# Altium PCB MainPCB.PcbDoc
Units mm, origin at the board's own origin, x right, y up, seen from the top; angles counter-clockwise.
Board outline 91 x 73 mm, 2 copper layers (Top Layer, Bottom Layer); 88 components, 40 nets, 344 pads, 4 vias.
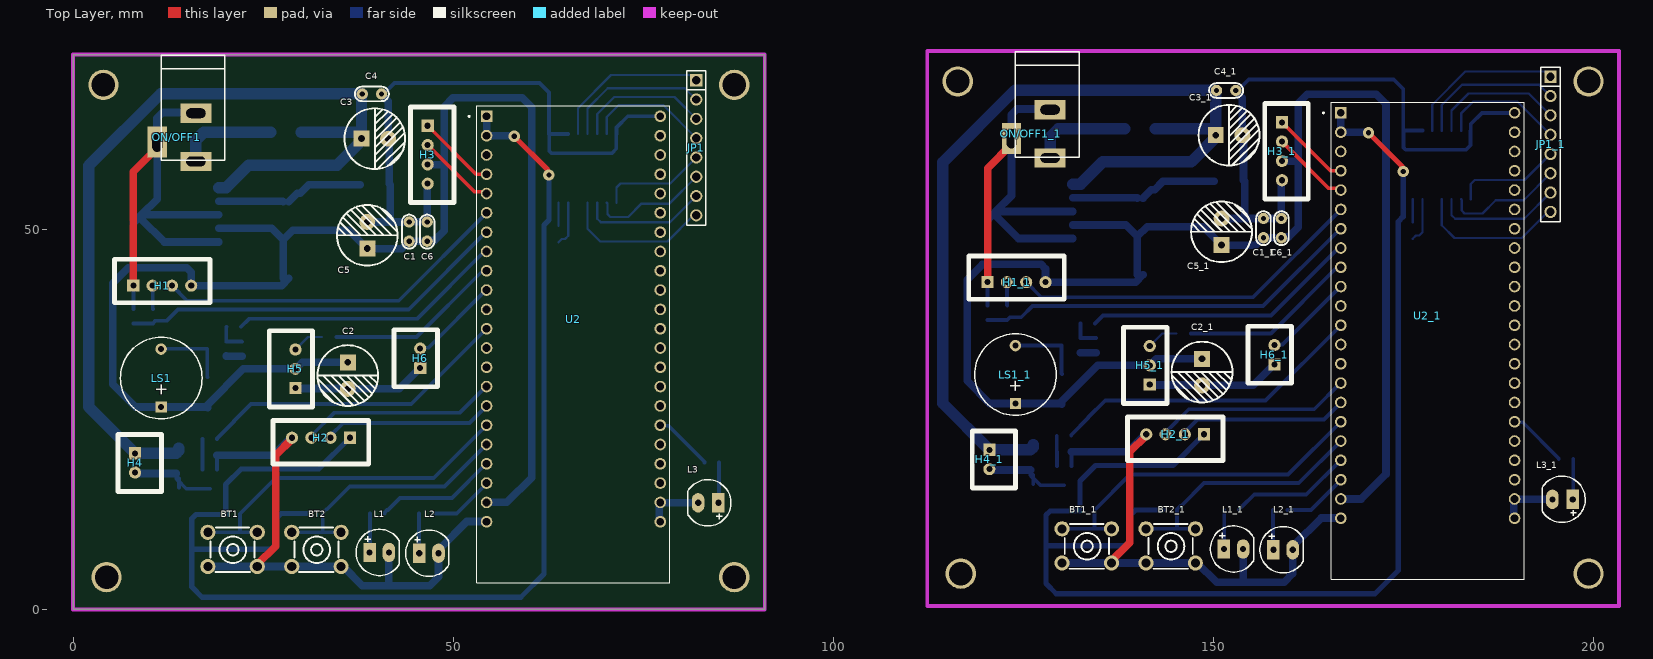
[diagram p0: Top Layer view]
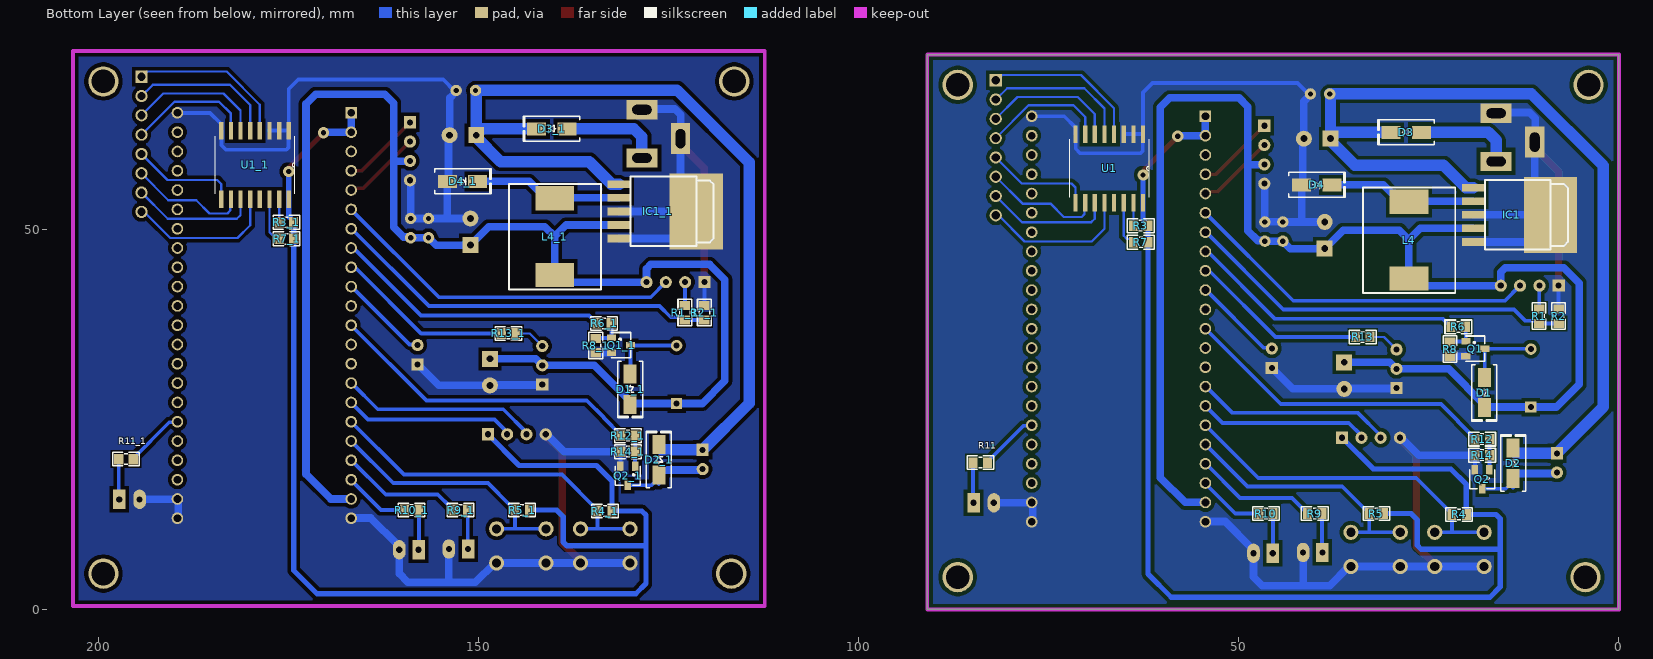
[diagram p1: Bottom Layer view, seen from below]

## Layer stack, top to bottom
Top Solder: solder mask 0.0102, Solder Resist, Dk 3.5
Top Layer: signal copper 0.0356
Dielectric 1: dielectric 0.32, FR-4, Dk 4.8
Bottom Layer: signal copper 0.0356
Bottom Solder: solder mask 0.0102, Solder Resist, Dk 3.5

## Board outline
-0.003,0.003 -0.003,73.003 90.997,73.003 90.997,0.003

## Design rules (kind name [scope] priority, off if disabled: settings)
Clearance [All] p1: gap=0.5 ignorepadtopadclearanceinfootprint=FALSE
PolygonConnect [All] p1: connectstyle=Direct reliefconductorwidth=0.254 reliefentries=4 polygonreliefangle="90 Angle" airgapwidth=0.254
RoutingVias [All] p1: holewidth=0.711 width=1.27 viastyle="Through Hole" minholewidth=0.711 minwidth=1.27 maxholewidth=0.711 maxwidth=1.27
SolderMaskExpansion [All] p1: expansion=0.102 istentingtop=FALSE
Width [All] p1: maxlimit=1 minlimit=0.3 preferedwidth=0.5
30 further rules are at their usual default settings.

## Classes and differential pairs
component class MainSCH: BT1 BT2 C1 C2 C3 C4 C5 C6 D1 D2 D3 D4 H1 H2 H3 H4 H5 H6 IC1 JP1 L1 L2 L3 L4 LS1 ON/OFF1 Q1 Q2 R1 R2 R3 R4 R5 R6 R7 R8 R9 R10 R11 R12 R13 R14 U1 U2

## Components (designator, comment, footprint, x,y, rotation, side; value= is the part's Value field where it differs from the comment)
BT1 "Button 2P SMD" PUSH_BUTTON_6X6 20.98,7.893 r180 top
BT1_1 "Button 2P SMD" PUSH_BUTTON_6X6 133.375,8.35 r180 top (schematic designator BT1)
BT2 "Button 2P SMD" PUSH_BUTTON_6X6 32.017,7.893 r180 top
BT2_1 "Button 2P SMD" PUSH_BUTTON_6X6 144.412,8.35 r180 top (schematic designator BT2)
C1 "100nF" "tu gom" 44.221,49.708 r90 top
C1_1 "100nF" "tu gom" 156.616,50.165 r90 top (schematic designator C1)
C2 "470uF" "tu hoa 8mm" 36.144,30.759 r270 top
C2_1 "470uF" "tu hoa 8mm" 148.539,31.217 r270 top (schematic designator C2)
C3 "470uF" "tu hoa 8mm" 39.7,61.932 r0 top
C3_1 "470uF" "tu hoa 8mm" 152.095,62.389 r0 top (schematic designator C3)
C4 "104" "tu gom" 39.319,67.818 r0 top
C4_1 "104" "tu gom" 151.714,68.275 r0 top (schematic designator C4)
C5 "470uF" "tu hoa 8mm" 38.71,49.225 r90 top
C5_1 "470uF" "tu hoa 8mm" 151.105,49.682 r90 top (schematic designator C5)
C6 "100nF" "tu gom" 46.584,49.708 r90 top
C6_1 "100nF" "tu gom" 158.979,50.165 r90 top (schematic designator C6)
D1 "SS34" "DIODE (DO-214AB)" 17.704,28.531 r270 bottom
D1_1 "SS34" "DIODE (DO-214AB)" 130.099,28.988 r270 bottom (schematic designator D1)
D2 "SS34" "DIODE (DO-214AB)" 13.925,19.234 r90 bottom
D2_1 "SS34" "DIODE (DO-214AB)" 126.32,19.692 r90 bottom (schematic designator D2)
D3 "SS34" "DIODE SMA" 27.991,62.763 r0 bottom
D3_1 "SS34" "DIODE SMA" 140.386,63.221 r0 bottom (schematic designator D3)
D4 "SS34" "DIODE SMA" 39.751,55.855 r180 bottom
D4_1 "SS34" "DIODE SMA" 152.146,56.312 r180 bottom (schematic designator D4)
H1 "HX711" XH2.54M-4 7.925,42.596 r0 top
H1_1 "HX711" XH2.54M-4 120.32,43.053 r0 top (schematic designator H1)
H2 "HX711" XH2.54M-4 36.424,22.581 r180 top
H2_1 "HX711" XH2.54M-4 148.819,23.038 r180 top (schematic designator H2)
H3 "LCD 1602" XH2.54M-4 46.66,63.627 r270 top
H3_1 "LCD 1602" XH2.54M-4 159.055,64.084 r270 top (schematic designator H3)
H4 "MC38" XH2.54M-2 8.159,20.536 r270 top
H4_1 "MC38" XH2.54M-2 120.554,20.993 r270 top (schematic designator H4)
H5 "SERVO" XH2.54M-3 29.261,29.108 r90 top
H5_1 "SERVO" XH2.54M-3 141.656,29.566 r90 top (schematic designator H5)
H6 "MC38" XH2.54M-2 45.669,31.775 r90 top
H6_1 "MC38" XH2.54M-2 158.064,32.233 r90 top (schematic designator H6)
IC1 "LM2576" TO-263-5 19.157,55.437 r270 bottom
IC1_1 "LM2576" TO-263-5 131.552,55.895 r270 bottom (schematic designator IC1)
JP1 "KEYPAD" "JP 1x8 DT" 81.991,69.621 r270 top
JP1_1 "KEYPAD" "JP 1x8 DT" 194.386,70.079 r270 top (schematic designator JP1)
L1 "LED 5mm" LED-5MM-RED 39.014,7.493 r0 top
L1_1 "LED 5mm" LED-5MM-RED 151.409,7.95 r0 top (schematic designator L1)
L2 "LED 5mm" LED-5MM-Yellow 45.542,7.391 r0 top
L2_1 "LED 5mm" LED-5MM-Yellow 157.937,7.849 r0 top (schematic designator L2)
L3 "LED 5mm" LED-5MM-Green 84.785,14.021 r180 top
L3_1 "LED 5mm" LED-5MM-Green 197.18,14.478 r180 top (schematic designator L3)
L4 "100uH" "CDRH127 12x12x7" 27.635,53.645 r0 bottom
L4_1 "100uH" "CDRH127 12x12x7" 140.03,54.102 r0 bottom (schematic designator L4)
LS1 "Coi Chip Speaker" "Coi Chip Speacker" 11.595,26.626 r90 top
LS1_1 "Coi Chip Speaker" "Coi Chip Speacker" 123.99,27.083 r90 top (schematic designator LS1)
ON/OFF1 "POWER" DC-IN 13.614,62.11 r270 top
ON/OFF1_1 "POWER" DC-IN 126.009,62.567 r270 top (schematic designator ON/OFF1)
Q1 "C1815" SOT-23 18.898,34.297 r270 bottom
Q1_1 "C1815" SOT-23 131.293,34.754 r270 bottom (schematic designator Q1)
Q2 "AO3400" SOT-23 18.014,17.126 r0 bottom
Q2_1 "AO3400" SOT-23 130.409,17.583 r0 bottom (schematic designator Q2)
R1 "1k" "tro smd 0805" 10.566,38.583 r90 bottom
R1_1 "1k" "tro smd 0805" 122.961,39.04 r90 bottom (schematic designator R1)
R2 "2k" "tro smd 0805" 7.874,38.583 r270 bottom
R2_1 "2k" "tro smd 0805" 120.269,39.04 r270 bottom (schematic designator R2)
R3 "4.7k" "tro smd 0805" 62.916,50.419 r0 bottom
R3_1 "4.7k" "tro smd 0805" 175.311,50.876 r0 bottom (schematic designator R3)
R4 "10k" "tro smd 0805" 21.031,12.548 r180 bottom
R4_1 "10k" "tro smd 0805" 133.426,13.005 r180 bottom (schematic designator R4)
R5 "10k" "tro smd 0805" 31.915,12.675 r180 bottom
R5_1 "10k" "tro smd 0805" 144.31,13.132 r180 bottom (schematic designator R5)
R6 "220R" "tro smd 0805" 21.133,37.236 r180 bottom
R6_1 "220R" "tro smd 0805" 133.528,37.694 r180 bottom (schematic designator R6)
R7 "4.7k" "tro smd 0805" 62.916,48.362 r180 bottom
R7_1 "4.7k" "tro smd 0805" 175.311,48.819 r180 bottom (schematic designator R7)
R8 "10k" "tro smd 0805" 22.286,34.25 r90 bottom
R8_1 "10k" "tro smd 0805" 134.681,34.707 r90 bottom (schematic designator R8)
R9 "220R" "tro smd 0805" 40.024,12.675 r180 bottom
R9_1 "220R" "tro smd 0805" 152.419,13.132 r180 bottom (schematic designator R9)
R10 "220R" "tro smd 0805" 46.45,12.675 r180 bottom
R10_1 "220R" "tro smd 0805" 158.845,13.132 r180 bottom (schematic designator R10)
R11 "220R" "tro smd 0805" 84.023,19.253 r0 bottom
R11_1 "220R" "tro smd 0805" 196.418,19.71 r0 bottom (schematic designator R11)
R12 "220R" "tro smd 0805" 17.989,22.46 r180 bottom
R12_1 "220R" "tro smd 0805" 130.384,22.917 r180 bottom (schematic designator R12)
R13 "220R" "tro smd 0805" 33.706,35.789 r0 bottom
R13_1 "220R" "tro smd 0805" 146.101,36.246 r0 bottom (schematic designator R13)
R14 "10k" "tro smd 0805" 17.989,20.352 r180 bottom
R14_1 "10k" "tro smd 0805" 130.384,20.809 r180 bottom (schematic designator R14)
U1 "PCF8574T/3,512" SOIC127P1032X265-16N 67.056,58.014 r270 bottom
U1_1 "PCF8574T/3,512" SOIC127P1032X265-16N 179.451,58.471 r270 bottom (schematic designator U1)
U2 "ESP32-S3-DEVKITC-1-N16R8V" ESP32-S3-DEVKITC-1-N16R8V 65.837,38.202 r0 top
U2_1 "ESP32-S3-DEVKITC-1-N16R8V" ESP32-S3-DEVKITC-1-N16R8V 178.232,38.659 r0 top (schematic designator U2)

## Footprints (in the part's own frame and the unit in brackets; to place one, negate y for a bottom-side part, rotate by r counter-clockwise, add the part's x,y. Pads: shape width x height; smd on the part's side, far side on the other; paste and mask are expansions set on the pad)
"CDRH127 12x12x7" [mm]
  rect 5.1x3.2 smd: 1(0,0) 2(0,10.1)
  silkscreen extent -6.1,-1.87 6.01,12, body extent -6,-1 6,11, height 7.42
"Coi Chip Speacker" [mm]
  rect 1.5x1.5 hole 0.8: 1(0,0)
  round 1.5 hole 0.8: 2(7.62,0.013)
  silkscreen extent -1.55,-5.38 9.18,5.36, body extent -2.2,-6 13.24,6, height 4.5
DC-IN [mil] "Jac DC input"
  rect 100x160 hole 50 slot 100 at 90 deg: 1(125,100) 2(-125,100)
  rect 160x100 hole 50 slot 100 at 0 deg: 3(25,-100)
  silkscreen extent -425,-80 120,250, body extent -410,-105 134,269, height 434
"DIODE (DO-214AB)" [mm]
  rect 2.5x1.7 smd: 1(-2,0) 2(2,0)
  silkscreen extent -3.68,-1.65 3.75,1.65, body extent -2.6,-1.37 2.6,1.37, height 2.4
"DIODE SMA" [mm] "SMA"
  rect 2.5x1.7 smd: 1(-2,0) 2(2,0)
  silkscreen extent -3.68,-1.65 3.75,1.65, body extent -2.6,-1.37 2.6,1.37, height 2.4
ESP32-S3-DEVKITC-1-N16R8V [mm]
  rect 1.53x1.53 hole 1.02 mask+0.102: J1_1(-11.43,26.67)
  round 1.53 hole 1.02 mask+0.102: J1_2(-11.43,24.13) J1_3(-11.43,21.59) J1_4(-11.43,19.05) J1_5(-11.43,16.51) J1_6(-11.43,13.97) J1_7(-11.43,11.43) J1_8(-11.43,8.89) J1_9(-11.43,6.35) J1_10(-11.43,3.81) J1_11(-11.43,1.27) J1_12(-11.43,-1.27) J1_13(-11.43,-3.81) J1_14(-11.43,-6.35) J1_15(-11.43,-8.89) J1_16(-11.43,-11.43) J1_17(-11.43,-13.97) J1_18(-11.43,-16.51) J1_19(-11.43,-19.05) J1_20(-11.43,-21.59) J1_21(-11.43,-24.13) J1_22(-11.43,-26.67) J3_1(11.43,26.67) J3_2(11.43,24.13) J3_3(11.43,21.59) J3_4(11.43,19.05) J3_5(11.43,16.51) J3_6(11.43,13.97) J3_7(11.43,11.43) J3_8(11.43,8.89) J3_9(11.43,6.35) J3_10(11.43,3.81) J3_11(11.43,1.27) J3_12(11.43,-1.27) J3_13(11.43,-3.81) J3_14(11.43,-6.35) J3_15(11.43,-8.89) J3_16(11.43,-11.43) J3_17(11.43,-13.97) J3_18(11.43,-16.51) J3_19(11.43,-19.05) J3_20(11.43,-21.59) J3_21(11.43,-24.13) J3_22(11.43,-26.67)
  silkscreen extent -13.82,-34.67 12.7,28.07, body extent -12.7,-35.26 12.7,34.38, height 7.39
"JP 1x8 DT" [mm] "8 pins, 1 row, straight, gold plating"
  rect 1.6x1.6 hole 1.1: 1(0,0)
  round 1.6 hole 1.1: 2(2.54,0) 3(5.08,0) 4(7.62,0) 5(10.16,0) 6(12.7,0) 7(15.24,0) 8(17.78,0)
  silkscreen extent -1.27,-1.27 19.05,1.27, body extent -1.27,-1.27 19.05,1.27, height 8.54
LED-5MM-Green [mil] "LED 2 PIN, 5 ly , Only colour,pin to pin 100mil"
  rect 65x100 hole 32: 1(-5,0)
  oval 65x100 hole 32: 2(100,0)
  silkscreen extent -70,-120 154,120, body extent -69,-120 145,117, height 339
LED-5MM-RED [mil] "LED 2 PIN, 5 ly , Only colour,pin to pin 100mil"
  rect 65x100 hole 32: 1(0,0)
  oval 65x100 hole 32: 2(100,0)
  silkscreen extent -70,-120 154,120, body extent -65,-119 149,118, height 339
LED-5MM-Yellow [mil] "LED 2 PIN, 5 ly , Only colour,pin to pin 100mil"
  rect 65x100 hole 32: 1(0,0)
  oval 65x100 hole 32: 2(100,0)
  silkscreen extent -70,-120 154,120, body extent -67,-122 147,115, height 339
PUSH_BUTTON_6X6 [mm]
  round 2 hole 1.2: 1(-3.25,-2.25) 1(3.25,-2.25) 2(-3.25,2.25) 2(3.25,2.25)
  silkscreen extent -2.9,-2.9 2.9,3, body extent -3.94,-3.07 4.07,2.93, height 6.8
SOIC127P1032X265-16N [mil]
  rect 90x22 smd: 1(-178,175) 2(-178,125) 3(-178,75) 4(-178,25) 5(-178,-25) 6(-178,-75) 7(-178,-125) 8(-178,-175) 9(178,-175) 10(178,-125) 11(178,-75) 12(178,-25) 13(178,25) 14(178,75) 15(178,125) 16(178,175)
  silkscreen extent -150,-206 150,207, body extent -203,-203 203,203, height 104
SOT-23 [mm]
  rect 0.85x1.2 smd: 1(-0.963,-1.245) 2(0.963,-1.25) 3(-0.018,1.25)
  silkscreen extent -1.67,-1.27 1.63,1.27, body extent -1.5,-1.33 1.5,1.17, height 1.06
TO-263-5 [mm]
  rect 1x3.048 smd: 1(-0.017,0.005) 2(1.761,0.005) 3(3.539,0.005) 4(5.317,0.005) 5(7.095,0.005)
  rect 10x7 smd: 6(3.539,10.165)
  silkscreen extent -1.03,1.53 8.11,12.45, body extent -1.54,-0.29 8.62,13.72, height 4.58
"tro smd 0805" [mm]
  rect 1.2x1.4 smd: 1(-0.946,-0.061) 2(0.954,-0.061)
  silkscreen extent -1.75,-0.97 1.75,0.84, body extent -1.56,-0.76 1.44,0.64, height 0.53
"tu gom" [mm] "Tu gom mini"
  round 1.5 hole 0.7: 1(-1.27,0) 2(1.27,0)
  silkscreen extent -2.25,-0.97 2.22,0.97, body extent -2.92,-0.85 2.92,0.85, height 6.12
"tu hoa 8mm" [mm]
  rect 2.1x2.1 hole 0.9: 1(-1.75,0)
  round 2.1 hole 0.9: 2(1.75,0)
  silkscreen extent -4,-4 4,4, body extent -4.1,-4.07 4.1,4.13, height 13.81
XH2.54M-2 [mm]
  rect 1.6x1.6 hole 0.8: 1(0,0)
  round 1.6 hole 0.8: 2(2.54,0)
  silkscreen extent -2.48,-2.26 5.02,3.46, body extent -2.48,-2.26 5.02,3.48, height 6.91
XH2.54M-3 [mm]
  rect 1.6x1.6 hole 0.8: 1(0,0)
  round 1.6 hole 0.8: 2(2.54,0) 3(5.08,0)
  silkscreen extent -2.48,-2.26 7.56,3.46, body extent -2.48,-2.26 7.56,3.48, height 6.91
XH2.54M-4 [mm]
  rect 1.6x1.6 hole 0.8: 1(0,0)
  round 1.6 hole 0.8: 2(2.54,0) 3(5.08,0) 4(7.62,0)
  silkscreen extent -2.48,-2.26 10.1,3.46, body extent -2.48,-2.26 10.1,3.48, height 6.91

## Part data
BT1 BT1_1 BT2 BT2_1: "Push Button Tactile Switch SMD 2 Pins 3x4x2mm.", JLCPCB PN=C231644
C1 C1_1 C4 C4_1 C6 C6_1: library part "Tu gom 104 50V", "Cắm", Chung_Loai=Cắm, Don_Vi=Con, Ma_Hang=MH004761, So_Chan=2, Ten_Linh_Kien="Tụ gốm 104 100nF 50V"
C2 C2_1: library part "Tu Hoa 470uF 16V 8x11", "Cắm", Chung_Loai=Cắm, Don_Vi=Con, Ma_Hang=MH006550, So_Chan=2, Ten_Linh_Kien="Tụ Hóa 470uF 16V 8x11MM"
C3 C3_1 C5 C5_1: library part "Tu Hoa 470uF 25V 8x13", "Cắm", Chung_Loai=Cắm, Don_Vi=Con, Ma_Hang="MH 470uF 25V", So_Chan=2, Ten_Linh_Kien="Tụ Hóa 470uF 25V"
D1 D1_1 D2 D2_1: library part "Diode SS34", "Diode SS34 ( 1N5822 ), DO-214AB", Chung_Loai=Dán, Don_Vi=Con, Ma_Hang=MH002104, Ten_Linh_Kien="Diode SS34 3A 40V SMA ( 1N5822 SS34A)"
D3 D3_1 D4 D4_1: library part "Diode SS34 ( 1N5822 )", "Dán", Chung_Loai=Dán, Don_Vi=Con, Ma_Hang=MH002104, Ten_Linh_Kien="Diode SS34 3A 40V SMA ( 1N5822 SS34A)"
H1 H1_1 H2 H2_1 H3 H3_1: library part "Header 4P 2.54 Duc Thang", "Cắm", Chung_Loai=Cắm, Don_Vi=Con, Ma_Hang=MH001285, Ten_Linh_Kien="Header 4P XH2.54-4P Đực Thẳng"
H4 H4_1 H6 H6_1: library part "Header 2P 2.54 Duc Thang", "Cắm", Chung_Loai=Cắm, Don_Vi=Con, Ma_Hang=MH001283, Ten_Linh_Kien="Header 2P XH2.54-2P Đực Thẳng"
H5 H5_1: library part "Header 3P 2.54 Duc Thang", "Cắm", Chung_Loai=Cắm, Don_Vi=Con, Ma_Hang=MH001292, Ten_Linh_Kien="Header 3P XH2.54-3P Đực Thẳng"
IC1 IC1_1: library part "LM2576 SMD", "LM2576 SMD AND ADJ (TO-263-5)"
JP1 JP1_1: library part "JP 1x8 2.54 Duc Thang", "Cắm", Chung_Loai=Cắm, Don_Vi=Con, Ma_Hang=MH000903, Ten_Linh_Kien="Jump Đơn Đực 2.54MM 1x40P Thẳng 11MM"
L1 L1_1: library part "LED 5mm Do", "Cắm", Chung_Loai=Cắm, Don_Vi=Con, Ma_Hang=MH008967, Ten_Linh_Kien="Led 5MM Phủ Đỏ (1000c)"
L2 L2_1: library part "LED 5mm Vang", "Cắm", Chung_Loai=Cắm, Don_Vi=Con, Ma_Hang=MH008968, Ten_Linh_Kien="Led 5MM Phủ Vàng (1000c)"
L3 L3_1: library part "LED 5mm Xanh La", "Cắm", Chung_Loai=Cắm, Don_Vi=Con, Ma_Hang=MH008969, Ten_Linh_Kien="LED 5MM Phủ Xanh (1000c)"
L4 L4_1: library part "Cuon Cam"
LS1 LS1_1: "Còi chip"
ON/OFF1 ON/OFF1_1: library part DCIN
Q1 Q1_1: "SOT-23", Chung_Loai=Dán, Don_Vi=Con, Ma_Hang=MH000946, Ten_Linh_Kien="C1815 SOT23 TRANS NPN 0.15A 50V (SMD-HF)"
Q2 Q2_1: library part "MOSFET AO3400", "N-Channel 30 V 5.8A (Ta) 1.4W (Ta) SOT-23-3", Package="SOT-23-3 Alpha &amp; Omega Semiconductor", Check_prices=https://www.snapeda.com/parts/AO3400/Alpha+%2526+Omega+Semiconductor+Inc./view-part/?ref=eda, MF="Alpha &", MP=AO3400, SnapEDA_Link=https://www.snapeda.com/parts/AO3400/Alpha+%2526+Omega+Semiconductor+Inc./view-part/?ref=snap
R1 R1_1 R2 R2_1 R3 R3_1 R4 R4_1 R5 R5_1 R6 R6_1 R7 R7_1 R8 R8_1 R9 R9_1 R10 R10_1 R11 R11_1 R12 R12_1 R13 R13_1 R14 R14_1: library part "Tro 0805", "Tro 0805 Dán", Chung_Loai=Dán, Don_Vi=Con, Ma_Hang=MH005792, So_Chan=2, Ten_Linh_Kien="Trở 0603 1% 0R"
U1 U1_1: "I/O Expander 8 IÂ²C 100 kHz 16-SO", Package="SOIC-16 NXP Semiconductors", Availability="In Stock", Check_prices=https://www.snapeda.com/parts/PCF8574T/3,512/NXP+USA+Inc./view-part/?ref=eda, MF="NXP USA", MP=PCF8574T/3,512, Price=None, Purchase-URL=https://pricing.snapeda.com/search/part/PCF8574T/3,512/?ref=eda, SnapEDA_Link=https://www.snapeda.com/parts/PCF8574T/3,512/NXP+USA+Inc./view-part/?ref=snap
U2 U2_1: "Development Boards & Kits - Wireless Gen-Purpose Dev Board, embeds ESP32-S3-WROOM-2-N16R8V, 16 MB Octal Flash, 8 MB Octal PSRAM, with Pin Header"

## Free pads (board coordinates)
  round 4 hole 3.1: 49(3.997,69.003) 49(4.403,4.25) 49(86.997,4.25) 49(86.997,69.003) 49(116.392,69.46) 49(116.798,4.707) 49(199.392,4.707) 49(199.392,69.46)

## Via types
v1: diameter 1.5, hole 0.7, Top Layer to Bottom Layer, 4 vias

## Nets (pads, with @x,y where several pads share a name; then routed paths per layer and width w, separated by ;. In a path a pad name is that pad's centre, name@x,y a point inside that pad or via, vN(x,y) a via of type N, cw(c..) or ccw(c..) an arc to the next point about the centre after c; other vN are vias at no path point)
+3V3: H2.1 R3.1 R4.2 R5.2 R7.2 U1.16 U2.J1_1 U2.J1_2 | length 169.9
  Top Layer w0.7: v1(58.039,62.255) 62.42,57.875 62.42,57.341 v1(62.611,57.15)
  Bottom Layer w0.7: R5.2 27.371,12.614 26.518,11.76 26.518,8.407 26.01,7.899 15.621,7.899 ; H2.1 32.309,18.466 22.123,18.466 20.077,16.419 R4.2 16.17,12.487 15.621,11.938 15.621,7.899 ; v1(62.611,57.15) U1.16 62.611,51.221 61.97,50.58 R3.1 61.966,50.475 61.966,48.305 R7.2 61.961,4.659 58.903,1.6 16.967,1.6 15.621,2.946 15.621,7.899
  Bottom Layer w1: U2.J1_1 U2.J1_2 54.445,62.293 58.001,62.293 v1(58.039,62.255)
+5V: C1.1 C2.1 C5.1 C6.1 D1.2 H1.4 H3.3 H5.2 IC1.4 L4.2 LS1.1 U2.J1_21 | length 199.6
  Bottom Layer w1: IC1.4 26.13,50.121 27.305,48.946 27.635,48.616 ; L4.2 27.635,48.616 ; L4.2@28.372,43.545 27.423,42.596 H1.4 15.545,44.372 14.959,44.958 7.264,44.958 5.232,42.926 5.232,29.616 8.223,26.626 LS1.1 17.609,26.626 D1.2 17.704,26.931 22.421,31.648 H5.2 29.286,31.648 30.147,32.509 C2.1 ; C5.1 36.293,49.892 28.912,49.892 27.635,48.616 ; C5.1@39.193,47.959 39.26,47.893 39.26,47.452 43.236,47.452 C1.1 ; C1.1@43.99,48.438 C6.1 46.679,48.533 47.517,48.533 48.819,49.835 48.819,58.496 ; H3.3@46.711,58.496 48.819,58.496 ; U2.J1_21 57.066,14.072 60.343,17.348 60.343,66.048 59.08,67.31 49.987,67.31 48.819,66.142 48.819,58.496
+12V: C3.1 C4.1 D2.2 D3.2 H4.1 IC1.1 | length 122.3
  Bottom Layer w1.5: D2.2 13.925,20.886 13.575,20.536 H4.1 2.047,26.648 2.047,58.359 11.551,67.863 C4.1@37.95,67.863 ; IC1.1 20.176,55.455 20.176,55.532 23.087,58.444 34.742,58.444 C3.1@38.09,61.792 ; D3.2 37.119,62.763 C3.1 37.95,67.365 37.954,67.369 37.954,67.722 C4.1
BT1: BT1.1 R4.1 U2.J1_17 | length 46.2
  Bottom Layer w0.5: BT1.1@17.73,10.143 22.014,10.143 ; BT1.1@24.23,10.143 22.014,10.143 ; U2.J1_17 47.457,17.281 26.671,17.281 21.977,12.587 21.977,10.18 22.014,10.143
BT2: BT2.1 R5.1 U2.J1_18 | length 34.2
  Bottom Layer w0.5: BT2.1@28.767,10.143 32.861,10.143 ; R5.1 32.861,10.143 ; R5.1@32.861,12.714 33.311,13.164 33.411,13.164 36.401,16.154 48.87,16.154 U2.J1_18 ; BT2.1@35.267,10.143 32.861,10.143
BUZZER: R6.1 U2.J1_8 | length 36.4
  Bottom Layer w0.5: R6.1 23.13,38.227 45.237,38.227 54.102,47.092 U2.J1_8
DATA: H2.3 U2.J1_15 | length 26
  Bottom Layer w0.5: H2.3 31.344,22.835 34.392,25.883 50.914,25.883 54.343,29.312 U2.J1_15
GND: BT1.2 BT2.2 C1.2 C2.2 C3.2 C4.2 C5.2 C6.2 D4.1 H1.1 H2.4 H3.4 H5.1 H6.1 IC1.3 IC1.5 IC1.6 L1.2 L2.2 L3.2 ON/OFF1.2 ON/OFF1.3 Q1.2 Q2.2 R2.1 R8.1 R14.1 U1.1 U1.2 U1.3 U1.8 U2.J1_22 U2.J3_1 U2.J3_21 U2.J3_22 | length 254.7
  Top Layer w1: H1.1 7.925,57.563 11.074,60.713 ON/OFF1.3 ; BT1.2@24.23,5.643 24.23,5.913 26.645,8.328 26.645,20.259 28.804,22.418 H2.4
  Bottom Layer w0.5: H1.1 7.935,42.586 R2.1 ; BT1.2@17.608,5.766 BT1.2@17.73,5.643 ; R14.1 18.956,20.27 18.956,18.397 Q2.2 ; C4.2 40.86,67.818 42.282,69.24 61.366,69.24 62.611,67.996 U1.1 ; U1.3 U1.2 U1.1 ; U2.J3_1 72.974,64.872 71.501,63.398 U1.8 71.472,62.505 71.472,60.6 70.891,60.02 62.933,60.02 62.64,60.313 62.64,62.505 U1.1
  Bottom Layer w1: IC1.6@7.925,50.832 IC1.6 ; ON/OFF1.2 16.059,65.38 11.811,65.38 11.024,64.592 11.024,61.525 ON/OFF1.3 11.074,53.982 IC1.6 ; BT1.2@17.73,5.643 24.23,5.643 28.767,5.643 35.267,5.643 35.537,5.643 38.056,3.124 41.631,3.124 ; R14.1 26.352,20.291 28.641,22.581 H2.4 ; IC1.5 11.992,48.343 8.992,51.343 IC1.6 ; IC1.3 IC1.6 ; Q1.2 20.162,33.319 22.21,33.319 R8.1 ; H5.1 29.31,29.059 36.095,29.059 C2.2 42.903,29.009 H6.1 ; C5.2 38.72,50.965 41.751,50.965 ; C4.2 40.589,67.683 41.45,66.822 C3.2 41.601,61.781 41.601,56.005 D4.1 41.751,50.965 ; L1.2 41.554,3.2 41.631,3.124 ; C1.2@44.221,50.965 41.751,50.965 ; C1.2 C6.2 46.584,55.905 H3.4@46.482,56.007 ; U2.J1_22 54.375,11.564 51.81,11.564 48.295,8.049 48.295,7.604 L2.2 48.082,4.267 46.939,3.124 41.631,3.124 ; U2.J3_22@77.14,11.564 77.165,11.589 77.165,12.008 77.14,12.033 77.14,13.801 77.165,13.827 U2.J3_21@77.165,14.046 ; U2.J3_21 77.292,14.046 82.22,14.046 L3.2
HC_ECHO: R1.1 R2.2 U2.J1_7 | length 51.4
  Bottom Layer w0.5: R2.2 7.939,37.633 R1.1@10.506,37.633 ; R1.1 10.856,37.987 12.358,37.987 13.818,39.446 44.157,39.446 54.343,49.632 U2.J1_7
HC_TRIG: H1.3 U2.J1_6 | length 47
  Bottom Layer w0.5: H1.3 14.986,40.615 42.85,40.615 U2.J1_6
I2C_SCL: H3.2 U2.J1_5 | length 10.4
  Top Layer w0.5: H3.2 52.8,54.947 54.171,54.947 U2.J1_5
I2C_SDA: H3.1 U2.J1_4 | length 10.5
  Top Layer w0.5: H3.1 53.035,57.252 U2.J1_4
  Bottom Layer w0.3: U2.J1_4@54.362,57.297 U2.J1_4
LED1: R9.1 U2.J1_19 | length 16.2
  Bottom Layer w0.5: R9.1 40.97,12.714 41.32,13.064 41.42,13.064 43.012,14.656 49.847,14.656 54.343,19.152 U2.J1_19
LED2: R10.1 U2.J1_20 | length 8.3
  Bottom Layer w0.5: R10.1 50.485,12.614 U2.J1_20@54.175,16.304
LED3: R11.1 U2.J3_17 | length 7.9
  Bottom Layer w0.5: U2.J3_17 77.341,24.157 78.335,24.157 83.078,19.414 R11.1
MC38_SIG: H6.2 U2.J1_10 | length 11.9
  Bottom Layer w0.5: H6.2 45.764,34.411 46.742,34.411 54.343,42.012 U2.J1_10
NetD1_1: D1.1 LS1.2 Q1.3 | length 9.8
  Bottom Layer w0.5: LS1.2 11.617,34.28 17.613,34.28 17.648,34.246 17.648,30.587 D1.1
NetD2_1: D2.1 H4.2 Q2.3 | length 17.4
  Bottom Layer w0.5: D2.1@13.925,16.024 D2.1 ; Q2.3 14.883,15.876 ; D2.1@13.575,17.184 D2.1@13.575,17.881 ; D2.1@13.575,17.184 14.883,15.876 ; D2.1@13.575,17.184 D2.1@13.575,17.881 ; D2.1@13.575,17.184 D2.1@13.725,17.034 ; D2.1@13.575,17.184 D2.1@13.725,17.034 ; D2.1@13.575,17.184 D2.1@13.575,17.881 ; D2.1@13.725,17.034 14.883,15.876 ; D2.1@13.725,17.034 14.883,15.876
  Bottom Layer w1: H4.2 8.274,17.881 D2.1@13.575,17.881
NetD3_1: D3.1 ON/OFF1.1 | length 13
  Bottom Layer w1.5: ON/OFF1.1 16.154,61.712 17.205,62.763 D3.1
NetD4_2: D4.2 IC1.2 L4.1 | length 18.8
  Bottom Layer w1: IC1.2 27.603,53.677 L4.1 ; L4.1@28.372,53.645 29.472,54.745 29.898,54.745 31.008,55.855 D4.2
NetH1_2: H1.2 R1.2 | length 3.1
  Bottom Layer w0.5: H1.2 10.485,42.575 10.485,39.557 R1.2
NetH5_3: H5.3 R13.1 | length 4.2
  Bottom Layer w0.3: H5.3 30.922,35.849 R13.1
NetJP1_1: JP1.1 U1.4 | length 21.1
  Bottom Layer w0.3: U1.4 66.421,65.938 70.79,70.307 81.165,70.307 81.201,70.271 81.341,70.271 JP1.1
NetJP1_2: JP1.2 U1.5 | length 19.4
  Bottom Layer w0.3: U1.5 67.691,65.913 70.358,68.58 80.493,68.58 JP1.2
NetJP1_3: JP1.3 U1.6 | length 17.8
  Bottom Layer w0.3: U1.6 68.961,65.176 71.196,67.412 79.121,67.412 JP1.3
NetJP1_4: JP1.4 U1.7 | length 16.4
  Bottom Layer w0.3: U1.7 70.231,64.77 71.806,66.345 77.648,66.345 JP1.4
NetJP1_5: JP1.5 U1.9 | length 14.1
  Bottom Layer w0.3: U1.9 71.501,55.507 72.031,56.037 78.566,56.037 JP1.5
NetJP1_6: JP1.6 U1.10 | length 15.5
  Bottom Layer w0.3: U1.10 70.307,53.416 70.307,52.019 70.688,51.638 73.05,51.638 74.799,53.387 78.456,53.387 JP1.6
NetJP1_7: JP1.7 U1.11 | length 16.7
  Bottom Layer w0.3: U1.11 68.961,51.41 69.444,50.927 78.537,50.927 JP1.7
NetJP1_8: JP1.8 U1.12 | length 19.8
  Bottom Layer w0.3: U1.12 67.691,50.089 69.367,48.412 78.21,48.412 81.639,51.841 JP1.8
NetL1_1: L1.1 R9.2 | length 5.1
  Bottom Layer w0.5: L1.1 39.07,7.548 R9.2
NetL2_1: L2.1 R10.2 | length 5.2
  Bottom Layer w0.5: R10.2 45.496,7.438 L2.1
NetL3_1: L3.1 R11.2 | length 5.3
  Bottom Layer w0.5: L3.1 84.978,14.086 R11.2
NetQ1_1: Q1.1 R6.2 R8.2 | length 4
  Bottom Layer w0.5: R6.2 20.16,37.157 20.16,35.277 Q1.1 20.17,35.232 22.198,35.232 R8.2
NetQ2_1: Q2.1 R12.2 R14.2 | length 4
  Bottom Layer w0.5: R12.2 R14.2 17.043,20.283 17.043,18.379 Q2.1
NetR3_2: R3.2 U1.15 | length 3
  Bottom Layer w0.3: R3.2 63.881,50.491 U1.15
NetR7_1: R7.1 U1.14 | length 6
  Bottom Layer w0.3: R7.1 64.302,48.741 64.736,48.741 65.151,49.157 U1.14
SCK: H2.2 U2.J1_16 | length 22.4
  Bottom Layer w0.5: H2.2 33.884,22.878 35.542,24.536 52.172,24.536 U2.J1_16
SERVO: R13.2 U2.J1_9 | length 23.4
  Bottom Layer w0.5: R13.2 45.197,35.849 53.702,44.355 54.21,44.355 U2.J1_9
Solenoid: R12.1 U2.J1_12 | length 41.6
  Bottom Layer w0.5: R12.1 18.934,22.499 21.16,24.725 21.16,24.767 23.419,27.026 44.501,27.026 U2.J1_12
pads on no net: BT1_1.1 BT1_1.2 BT2_1.1 BT2_1.2 C1_1.1 C1_1.2 C2_1.1 C2_1.2 C3_1.1 C3_1.2 C4_1.1 C4_1.2 C5_1.1 C5_1.2 C6_1.1 C6_1.2 D1_1.1 D1_1.2 D2_1.1 D2_1.2 D3_1.1 D3_1.2 D4_1.1 D4_1.2 H1_1.1 H1_1.2 H1_1.3 H1_1.4 H2_1.1 H2_1.2 H2_1.3 H2_1.4 H3_1.1 H3_1.2 H3_1.3 H3_1.4 H4_1.1 H4_1.2 H5_1.1 H5_1.2 H5_1.3 H6_1.1 H6_1.2 IC1_1.1 IC1_1.2 IC1_1.3 IC1_1.4 IC1_1.5 IC1_1.6 JP1_1.1 JP1_1.2 JP1_1.3 JP1_1.4 JP1_1.5 JP1_1.6 JP1_1.7 JP1_1.8 L1_1.1 L1_1.2 L2_1.1 L2_1.2 L3_1.1 L3_1.2 L4_1.1 L4_1.2 LS1_1.1 LS1_1.2 ON/OFF1_1.1 ON/OFF1_1.2 ON/OFF1_1.3 Q1_1.1 Q1_1.2 Q1_1.3 Q2_1.1 Q2_1.2 Q2_1.3 R1_1.1 R1_1.2 R2_1.1 R2_1.2 R3_1.1 R3_1.2 R4_1.1 R4_1.2 R5_1.1 R5_1.2 R6_1.1 R6_1.2 R7_1.1 R7_1.2 R8_1.1 R8_1.2 R9_1.1 R9_1.2 R10_1.1 R10_1.2 R11_1.1 R11_1.2 R12_1.1 R12_1.2 R13_1.1 R13_1.2 R14_1.1 R14_1.2 U1.13 U1_1.1 U1_1.2 U1_1.3 U1_1.4 U1_1.5 U1_1.6 U1_1.7 U1_1.8 U1_1.9 U1_1.10 U1_1.11 U1_1.12 U1_1.13 U1_1.14 U1_1.15 U1_1.16 U2.J1_3 U2.J1_11 U2.J1_13 U2.J1_14 U2.J3_2 U2.J3_3 U2.J3_4 U2.J3_5 U2.J3_6 U2.J3_7 U2.J3_8 U2.J3_9 U2.J3_10 U2.J3_11 U2.J3_12 U2.J3_13 U2.J3_14 U2.J3_15 U2.J3_16 U2.J3_18 U2.J3_19 U2.J3_20 U2_1.J1_1 U2_1.J1_2 U2_1.J1_3 U2_1.J1_4 U2_1.J1_5 U2_1.J1_6 U2_1.J1_7 U2_1.J1_8 U2_1.J1_9 U2_1.J1_10 U2_1.J1_11 U2_1.J1_12 U2_1.J1_13 U2_1.J1_14 U2_1.J1_15 U2_1.J1_16 U2_1.J1_17 U2_1.J1_18 U2_1.J1_19 U2_1.J1_20 U2_1.J1_21 U2_1.J1_22 U2_1.J3_1 U2_1.J3_2 U2_1.J3_3 U2_1.J3_4 U2_1.J3_5 U2_1.J3_6 U2_1.J3_7 U2_1.J3_8 U2_1.J3_9 U2_1.J3_10 U2_1.J3_11 U2_1.J3_12 U2_1.J3_13 U2_1.J3_14 U2_1.J3_15 U2_1.J3_16 U2_1.J3_17 U2_1.J3_18 U2_1.J3_19 U2_1.J3_20 U2_1.J3_21 U2_1.J3_22
copper on no net: | length 1380.4
  Top Layer w0.5: 159.055,61.544 165.195,55.404 166.566,55.404 166.802,55.169 ; 159.055,64.084 165.43,57.709 166.802,57.709
  Top Layer w0.7: v1(170.434,62.713) 174.815,58.332 174.815,57.799 v1(175.006,57.607)
  Top Layer w1: 120.32,43.053 120.32,58.02 123.469,61.17 123.469,61.932 ; 136.625,6.1 136.625,6.371 139.04,8.785 139.04,20.716 141.199,22.875 141.199,23.038
  Bottom Layer w0.3: 141.656,34.646 143.317,36.307 145.155,36.307 ; 166.757,57.754 166.802,57.709 ; 176.256,48.758 176.697,49.198 177.131,49.198 177.546,49.614 177.546,53.95 ; 176.265,50.937 176.276,50.948 176.276,53.95 ; 178.816,62.992 178.816,66.396 183.185,70.764 193.56,70.764 193.596,70.729 193.736,70.729 194.386,70.079 ; 180.086,53.95 180.086,50.546 181.762,48.87 190.605,48.87 194.034,52.299 194.386,52.299 ; 180.086,62.992 180.086,66.37 182.753,69.037 192.888,69.037 194.386,67.539 ; 181.356,53.95 181.356,51.867 181.839,51.384 190.932,51.384 194.386,54.839 ; 181.356,62.992 181.356,65.634 183.591,67.869 191.516,67.869 194.386,64.999 ; 182.626,53.95 182.702,53.873 182.702,52.476 183.083,52.095 185.445,52.095 187.194,53.844 190.851,53.844 194.386,57.379 ; 182.626,62.992 182.626,65.227 184.201,66.802 190.043,66.802 194.386,62.459 ; 183.896,53.95 183.896,55.964 184.426,56.494 190.961,56.494 194.386,59.919
  Bottom Layer w0.5: 120.32,43.053 120.33,43.043 120.33,39.985 ; 120.33,38.085 120.334,38.09 122.901,38.09 ; 122.86,43.053 122.88,43.033 122.88,40.015 122.901,39.994 ; 122.901,38.094 123.251,38.444 124.753,38.444 126.213,39.903 156.552,39.903 166.738,50.089 166.802,50.089 ; 123.977,34.703 124.012,34.737 130.008,34.737 130.043,34.703 130.043,31.044 130.099,30.988 ; 125.4,43.053 127.381,41.072 155.245,41.072 166.802,52.629 ; 126.32,16.481 126.32,17.692 ; 129.43,22.857 129.43,20.748 129.438,20.74 129.438,18.837 129.447,18.828 ; 130.003,6.223 130.125,6.1 ; 130.125,10.6 134.409,10.6 ; 130.392,16.333 127.278,16.333 ; 131.329,20.748 131.351,20.727 131.351,18.855 131.372,18.833 ; 131.329,22.857 131.329,22.957 133.555,25.182 133.555,25.224 135.814,27.483 156.896,27.483 166.802,37.389 ; 132.573,37.633 132.555,37.615 132.555,35.735 132.537,35.716 132.565,35.689 134.593,35.689 134.62,35.662 ; 134.473,37.633 135.525,38.684 157.632,38.684 166.497,47.549 166.802,47.549 ; 136.625,10.6 134.409,10.6 ; 141.162,10.6 145.256,10.6 ; 143.739,23.038 143.739,23.292 146.787,26.34 163.309,26.34 166.738,29.769 166.802,29.769 ; 145.256,13.071 145.256,10.6 ; 145.256,13.171 145.706,13.621 145.806,13.621 148.796,16.612 161.265,16.612 166.802,22.149 ; 146.279,23.038 146.279,23.335 147.937,24.994 164.567,24.994 166.802,27.229 ; 147.055,36.307 157.592,36.307 166.097,44.812 166.605,44.812 166.802,45.009 ; 147.662,10.6 145.256,10.6 ; 151.409,7.95 151.465,8.006 151.465,13.071 ; 152.984,68.275 153.255,68.275 154.677,69.698 173.761,69.698 175.006,68.453 175.006,62.992 ; 153.365,13.071 153.365,13.171 153.715,13.521 153.815,13.521 155.407,15.113 162.242,15.113 166.738,19.609 166.802,19.609 ; 157.891,13.071 157.891,7.895 157.937,7.849 ; 158.064,34.773 158.159,34.868 159.137,34.868 166.738,42.469 166.802,42.469 ; 159.791,13.071 162.88,13.071 166.57,16.761 ; 166.802,24.689 159.852,17.739 139.066,17.739 134.372,13.044 134.372,10.637 134.409,10.6 ; 177.546,62.992 176.276,62.992 175.006,62.992 ; 189.662,24.689 189.736,24.614 190.73,24.614 195.473,19.871 195.473,19.771 ; 189.662,65.329 185.369,65.329 183.896,63.856 183.896,62.992 183.867,62.963 183.867,61.058 183.286,60.477 175.328,60.477 175.035,60.77 175.035,62.963 175.006,62.992 ; 197.307,14.478 197.373,14.543 197.373,19.771 ; 125.97,17.642 125.97,18.339 ; 125.97,17.642 126.12,17.492 ; 125.97,17.642 126.12,17.492 ; 125.97,17.642 125.97,18.339 ; 125.97,17.642 127.278,16.333 ; 125.97,17.642 125.97,18.339 ; 126.12,17.492 127.278,16.333 ; 126.12,17.492 127.278,16.333
  Bottom Layer w0.7: 143.356,13.071 139.766,13.071 138.913,12.217 138.913,8.865 138.405,8.357 128.016,8.357 ; 148.819,23.038 144.704,18.923 134.518,18.923 132.472,16.876 132.472,12.944 128.565,12.944 128.016,12.395 128.016,8.357 ; v1(175.006,57.607) 175.006,53.95 175.006,51.678 174.365,51.037 174.365,50.937 174.361,50.933 174.361,48.762 174.356,48.758 174.356,5.116 171.298,2.057 129.362,2.057 128.016,3.404 128.016,8.357
  Bottom Layer w1: 120.32,51.289 121.387,52.356 ; 120.554,18.453 120.669,18.339 125.97,18.339 ; 128.549,65.742 128.454,65.837 124.206,65.837 123.419,65.049 123.419,61.983 123.469,61.932 123.469,54.439 121.387,52.356 ; 130.125,6.1 136.625,6.1 141.162,6.1 147.662,6.1 147.932,6.1 150.451,3.581 154.026,3.581 ; 131.329,20.748 138.747,20.748 141.036,23.038 141.199,23.038 ; 131.547,48.8 124.387,48.8 121.387,51.8 121.387,52.356 ; 131.547,50.578 138.525,50.578 139.7,49.403 140.03,49.073 ; 131.547,52.356 121.387,52.356 ; 131.547,54.134 139.998,54.134 140.03,54.102 ; 132.543,33.791 132.557,33.776 134.605,33.776 134.62,33.762 ; 140.03,44.002 140.03,49.073 ; 140.767,44.002 139.818,43.053 127.94,43.053 127.94,44.829 127.354,45.415 119.659,45.415 117.627,43.383 117.627,30.074 120.618,27.083 123.99,27.083 130.004,27.083 130.099,26.988 130.099,27.388 134.816,32.106 141.656,32.106 141.681,32.106 142.542,32.967 148.539,32.967 ; 140.767,54.102 141.867,55.202 142.293,55.202 143.403,56.312 150.146,56.312 ; 141.656,29.566 141.705,29.516 148.49,29.516 148.539,29.467 155.298,29.467 158.064,32.233 ; 151.105,47.932 148.688,50.349 141.307,50.349 140.03,49.073 ; 151.105,51.432 151.115,51.422 154.146,51.422 ; 151.588,48.416 151.655,48.35 151.655,47.91 155.631,47.91 156.616,48.895 ; 152.984,68.275 152.984,68.14 153.845,67.279 153.845,62.389 153.996,62.239 153.996,56.462 154.146,56.312 154.146,51.422 ; 153.949,7.95 153.949,3.658 154.026,3.581 ; 156.385,48.895 158.979,48.895 159.074,48.991 159.912,48.991 161.214,50.292 161.214,58.953 ; 156.616,51.422 154.146,51.422 ; 156.616,51.435 158.979,51.435 158.979,56.363 158.877,56.464 ; 159.106,58.953 161.214,58.953 ; 166.802,11.989 166.77,12.021 164.205,12.021 160.69,8.506 160.69,8.061 160.477,7.849 160.477,4.724 159.334,3.581 154.026,3.581 ; 166.802,14.529 169.461,14.529 172.738,17.805 172.738,66.505 171.475,67.767 162.382,67.767 161.214,66.599 161.214,58.953 ; 166.802,65.329 166.802,62.789 166.84,62.751 170.396,62.751 v1(170.434,62.713) ; 189.535,12.021 189.56,12.046 189.56,12.465 189.535,12.491 189.535,14.258 189.56,14.284 189.56,14.503 ; 189.662,14.529 189.687,14.503 194.615,14.503 194.64,14.478
  Bottom Layer w1.5: 126.32,21.692 126.32,21.343 125.97,20.993 120.554,20.993 114.442,27.105 114.442,58.816 123.946,68.32 150.345,68.32 ; 128.549,59.392 128.549,62.17 129.6,63.221 138.386,63.221 ; 131.547,55.912 132.571,55.912 132.571,55.99 135.482,58.901 147.137,58.901 150.485,62.249 ; 142.386,63.221 149.514,63.221 150.345,62.389 150.345,67.823 150.349,67.826 150.349,68.18 150.444,68.275

## Polygon pours and split planes (outlines as drawn)
no net on Bottom Layer "NONET_L-01_P-001" (solid, remove dead copper, pour order 1): 112.392,73.46 112.392,0.46 203.392,0.46 203.392,73.46
GND on Bottom Layer "NONET_L-01_P-001" (solid, remove dead copper, pour order 0): -0.003,73.003 -0.003,0.003 90.997,0.003 90.997,73.003

## Keep-outs
Keep-Out Layer:
  lines w0.5: -0.003,0.003 -0.003,73.003 90.997,73.003 90.997,0.003 -0.003,0.003 ; 112.392,0.46 203.392,0.46 203.392,73.46 112.392,73.46 112.392,0.46

## Text inside footprints (layer, text, board x,y; h text height)
LS1: Top Overlay "+" at 12.306,28.035 h1.52 r90
LS1_1: Top Overlay "+" at 124.701,28.493 h1.52 r90